# Altium PCB ResearchProject_V3_PCB.PcbDoc (part 1 of 2)
Units mil, origin at the board's own origin, x right, y up, seen from the top; angles counter-clockwise.
Board outline 6000 x 4000 mil, 4 copper layers (Top Layer, GND, 3V3, Bottom Layer), stack 23.756 mil thick; 138 components, 184 nets, 719 pads, 107 vias.
Unrouted connection lines stored in the file: 106.
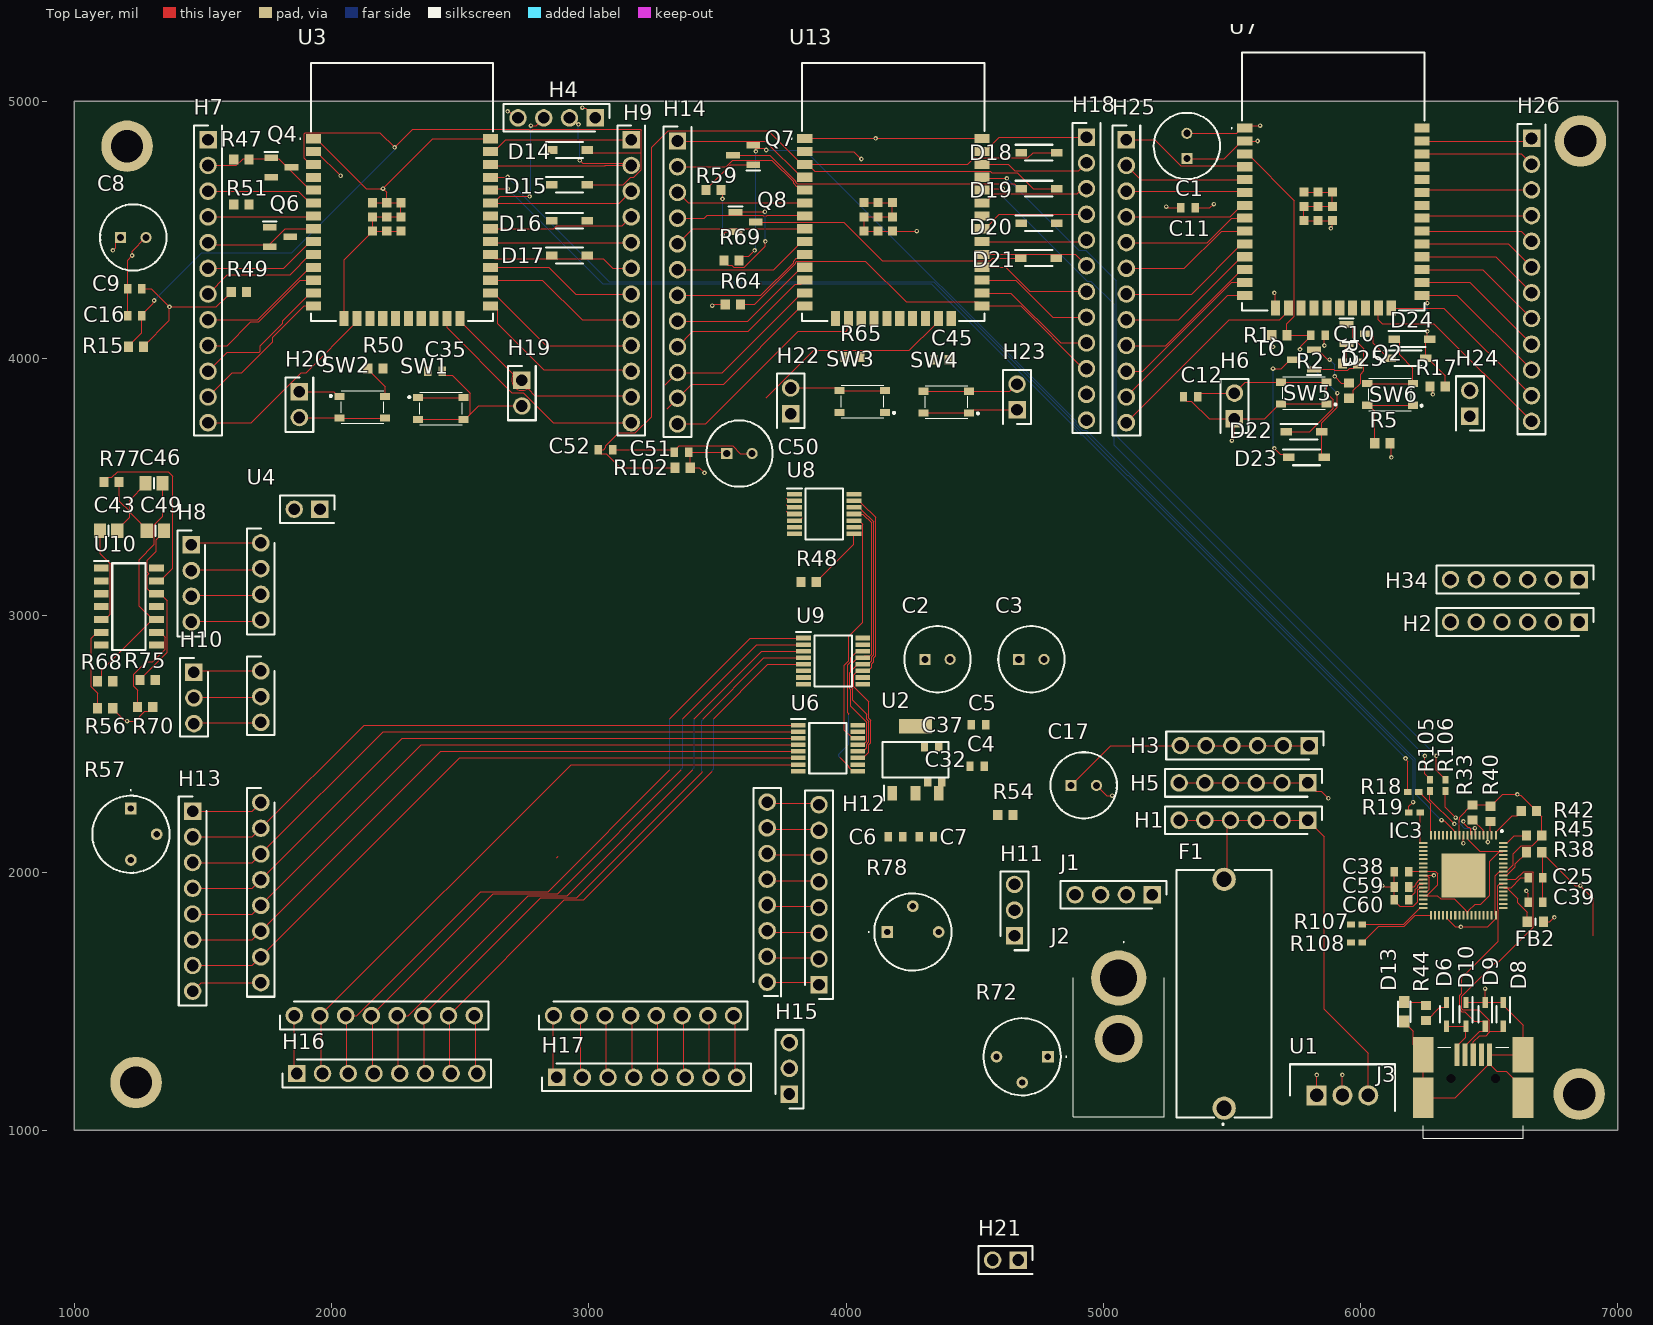
[diagram p0: Top Layer view]
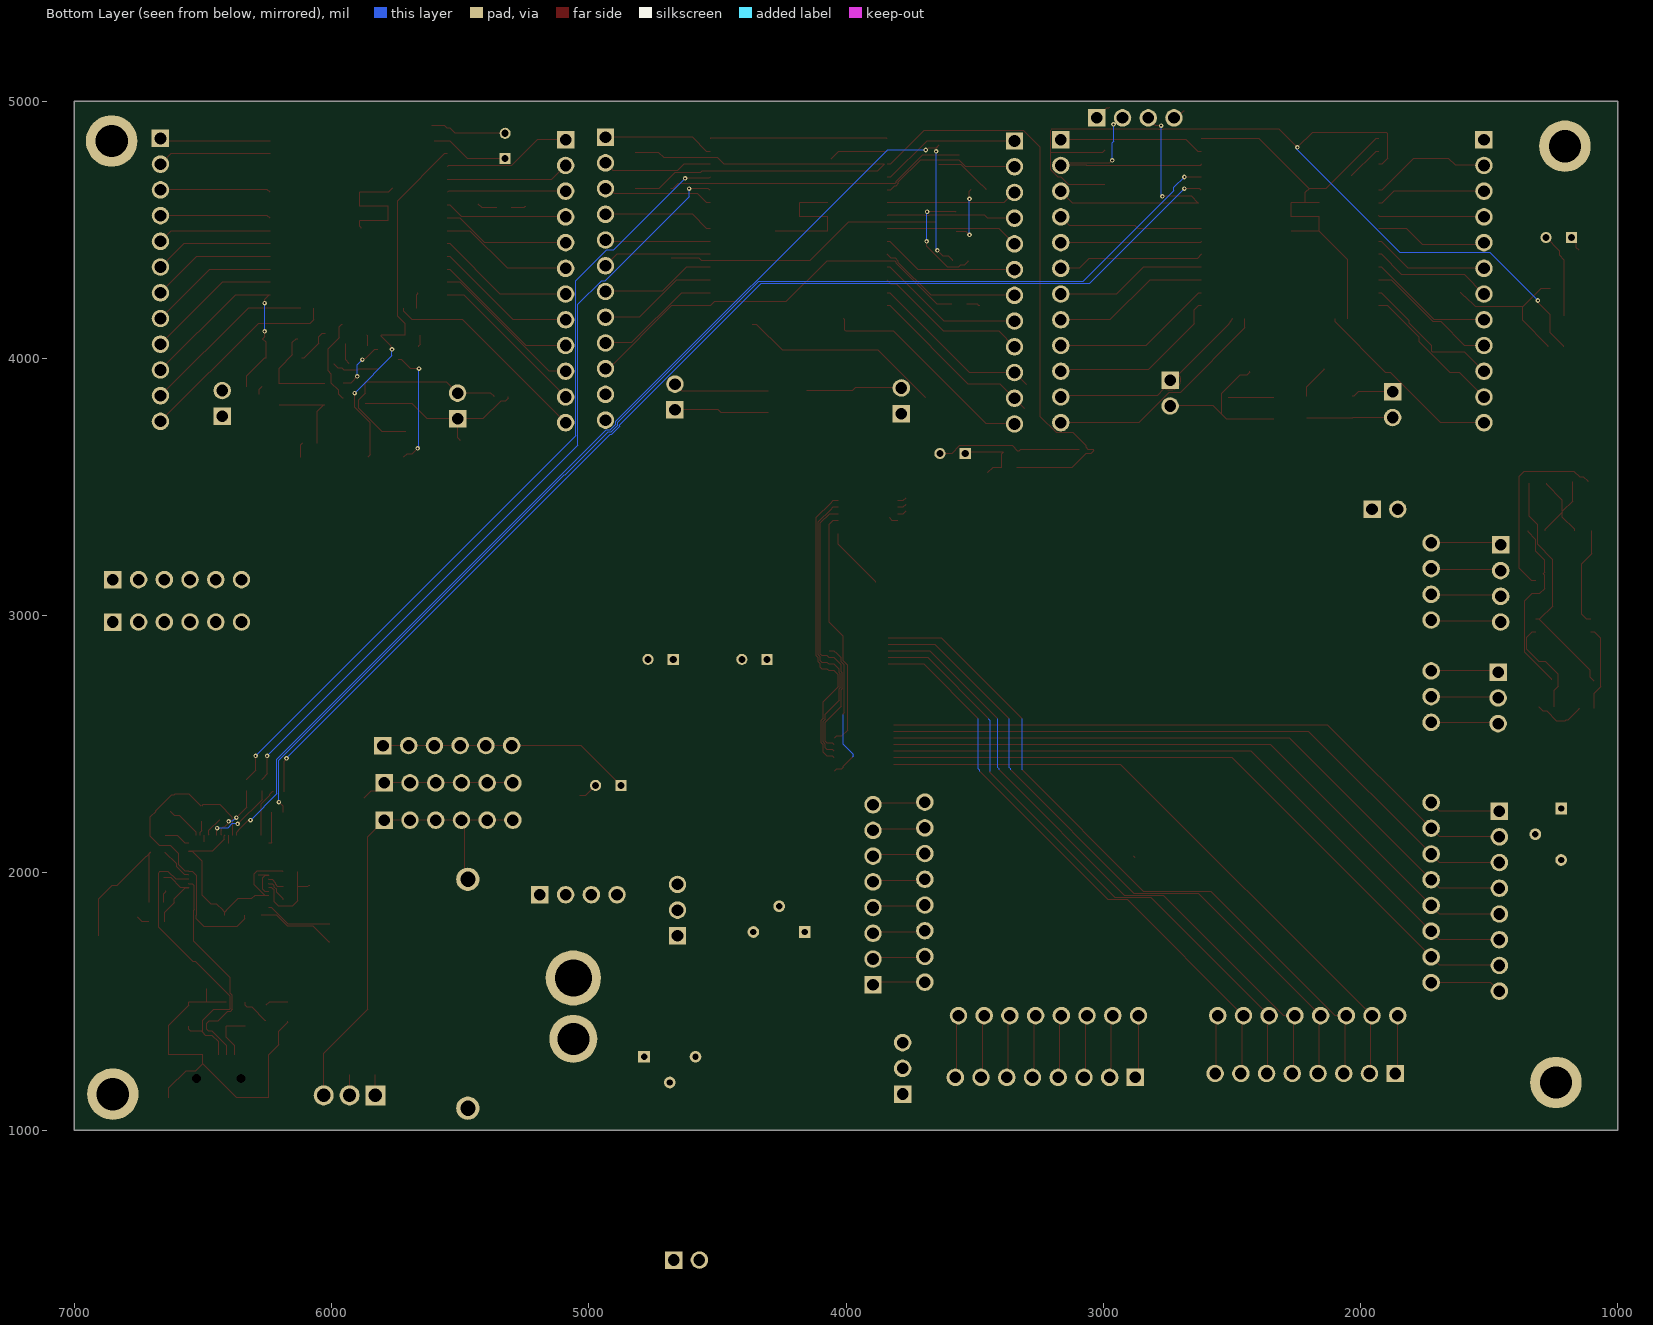
[diagram p1: Bottom Layer view, seen from below]
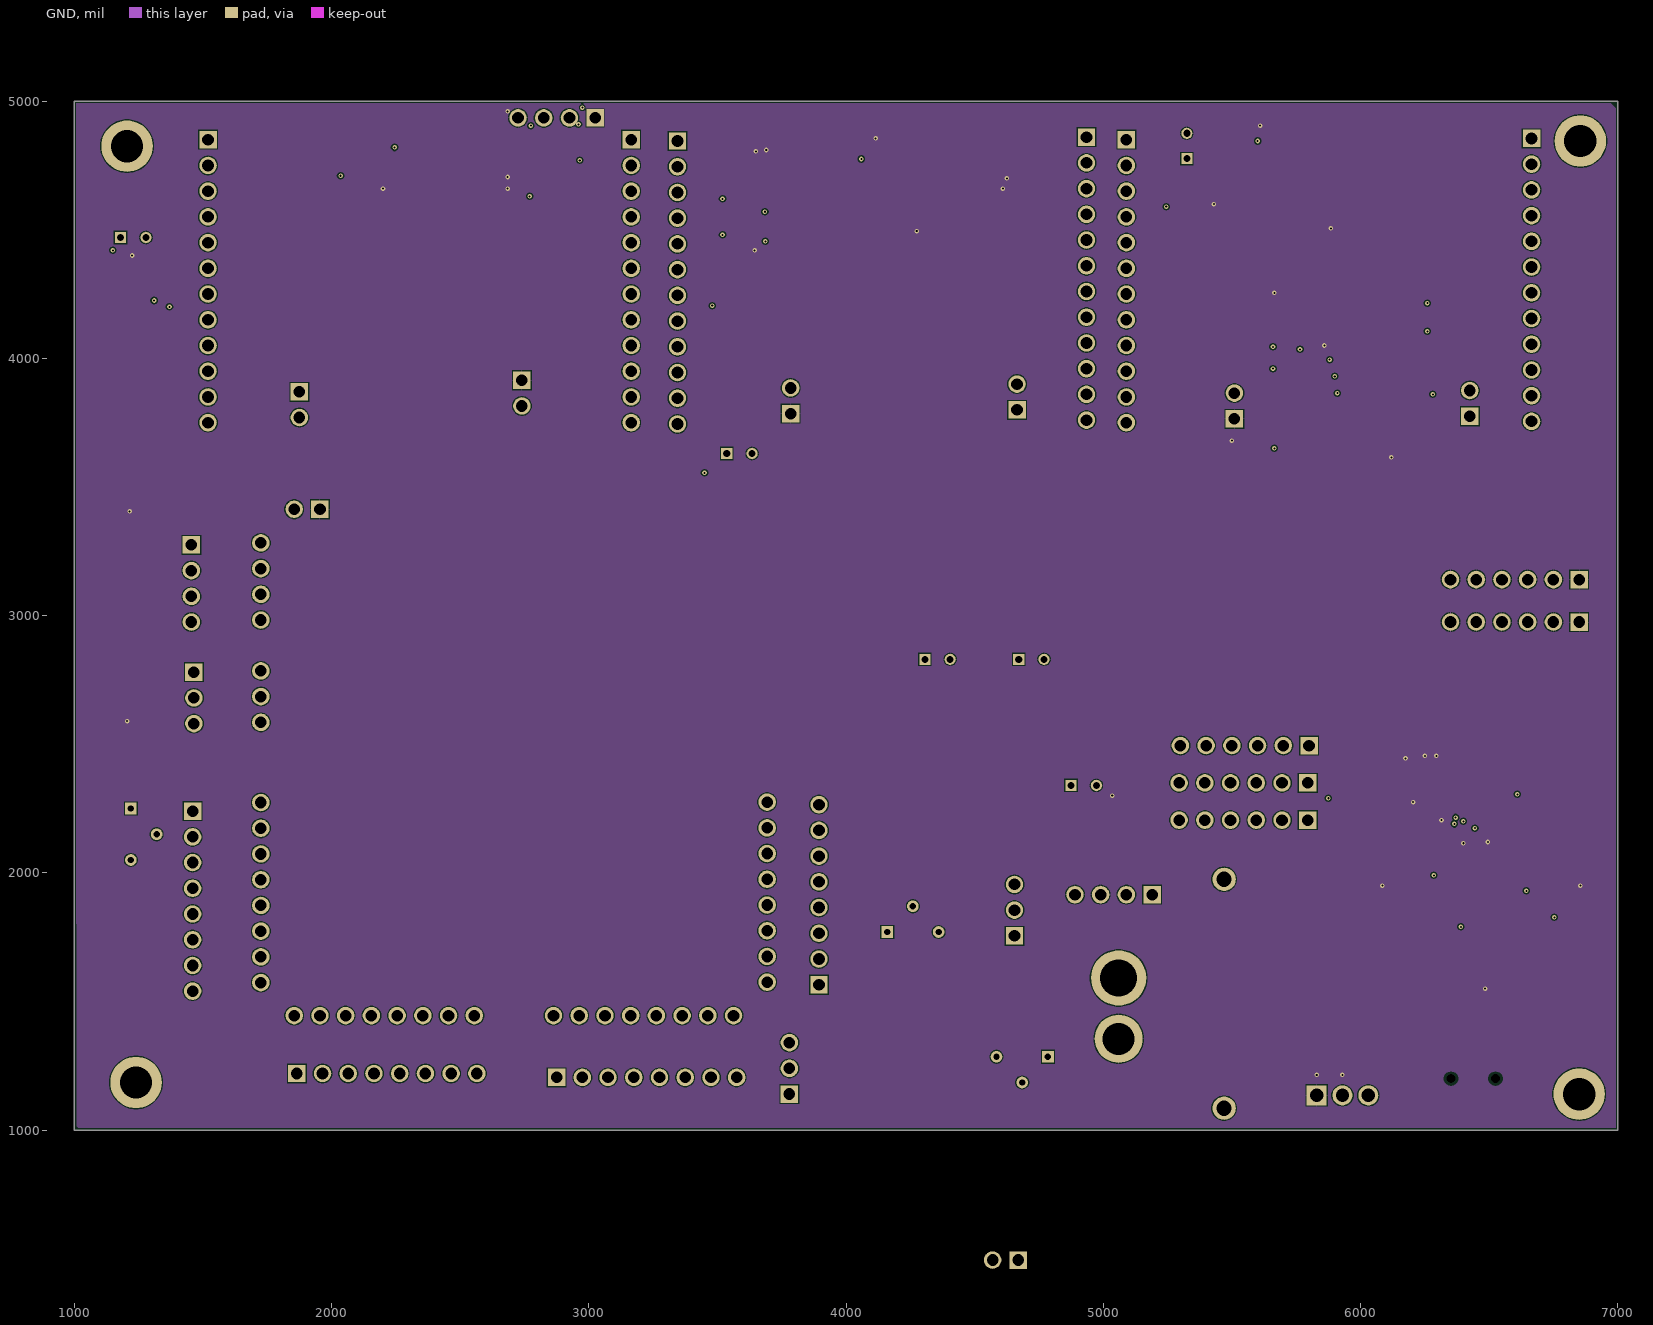
[diagram p2: GND]
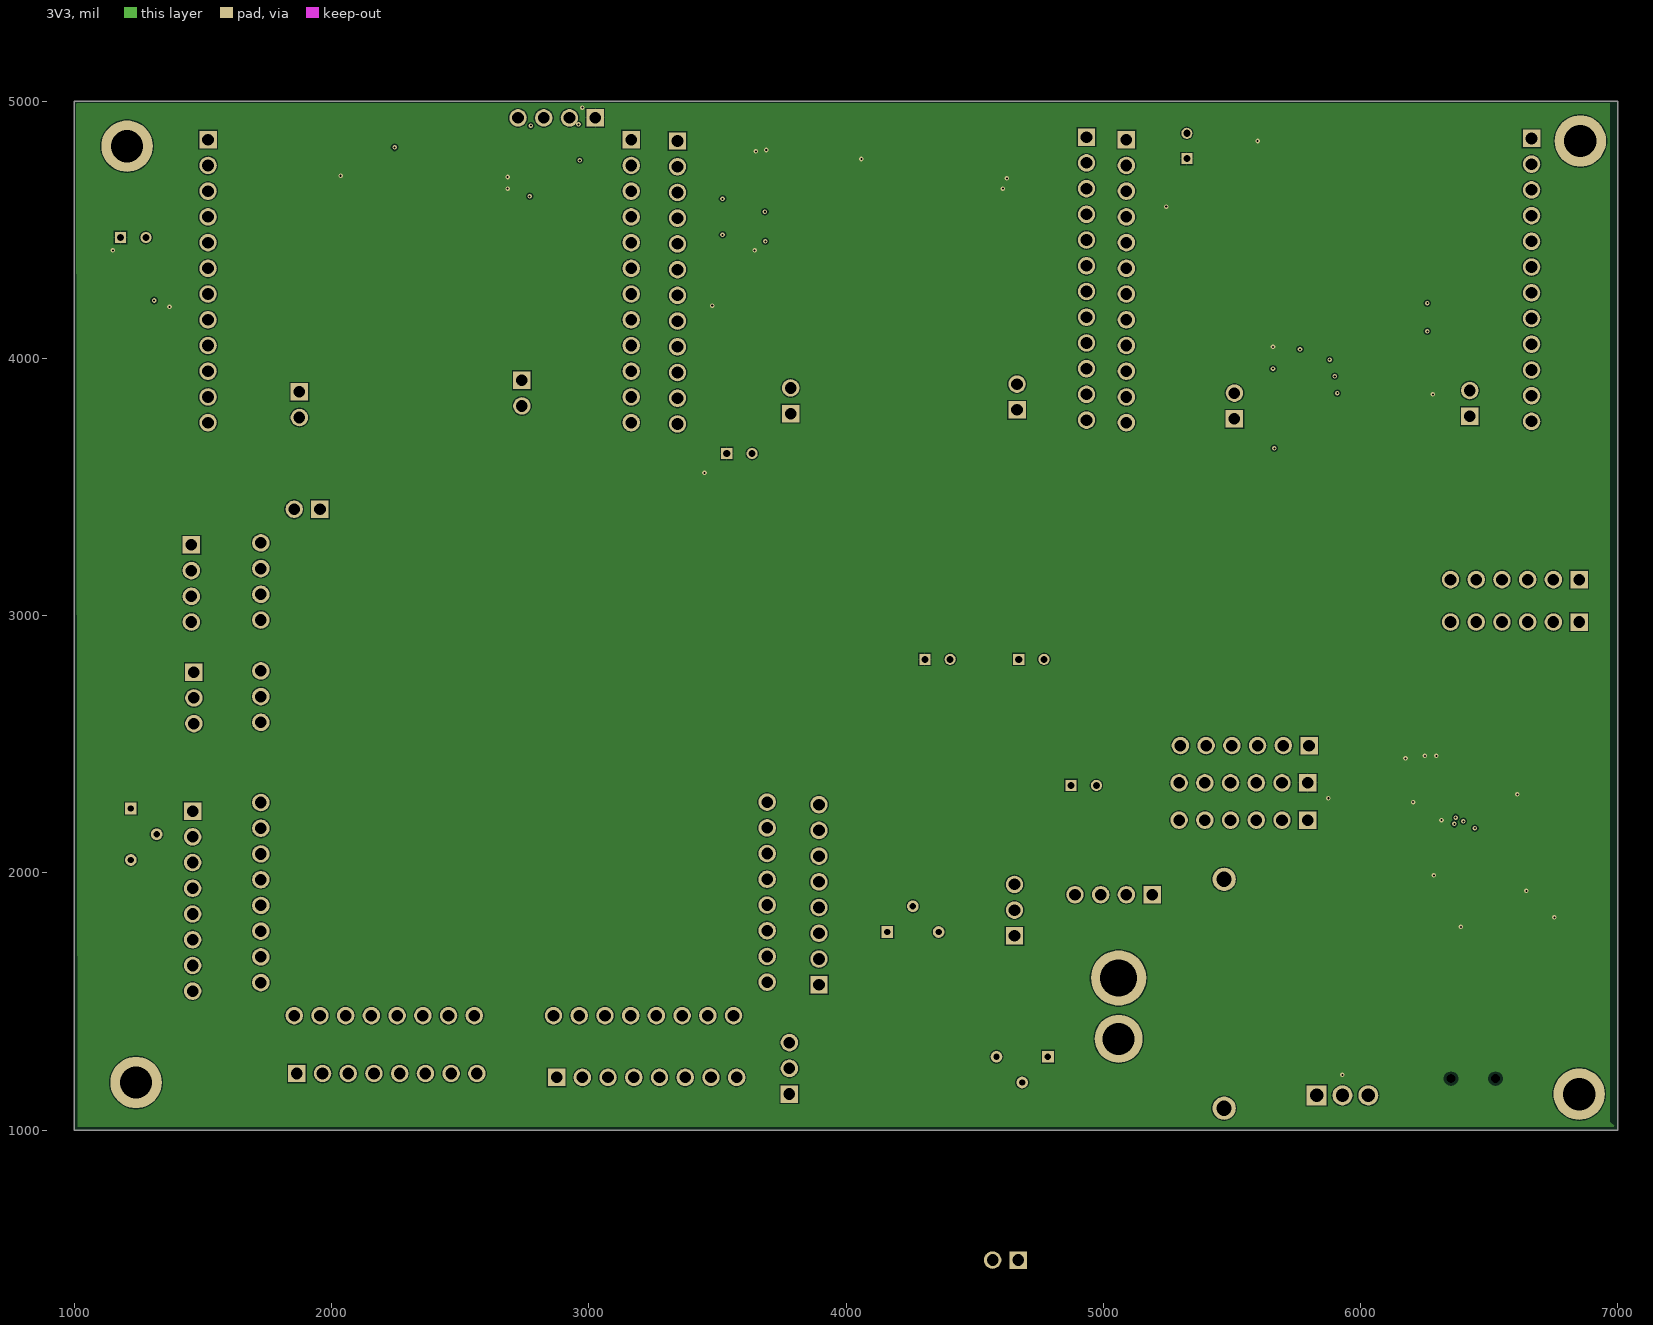
[diagram p3: 3V3]
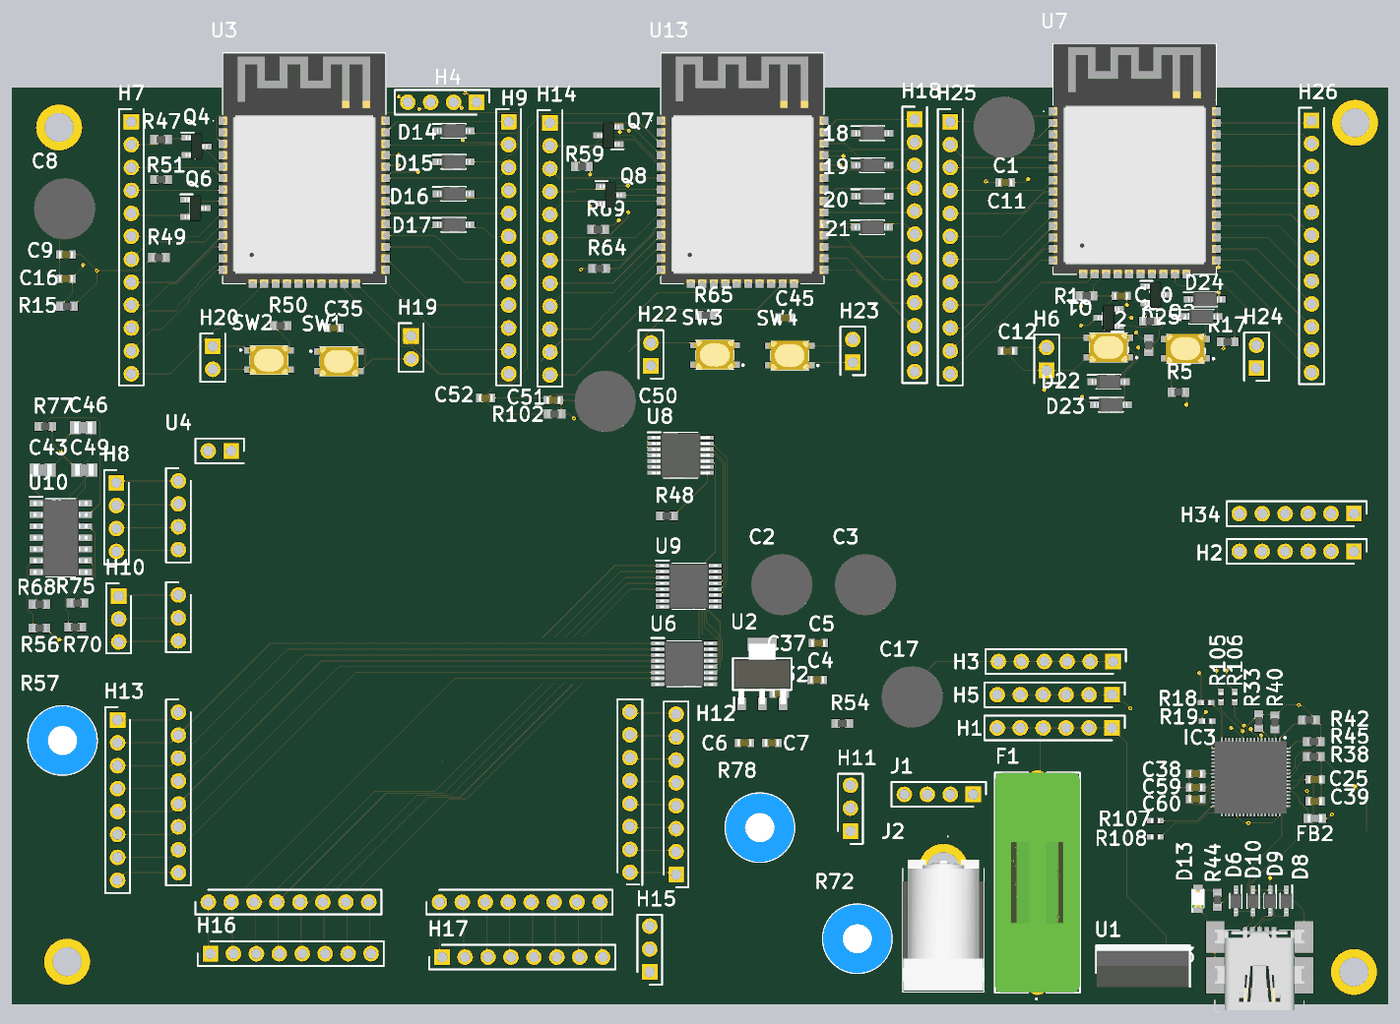
[diagram p5: 3D render of the assembled board from above, using the file's embedded part models]

## Layer stack, top to bottom
Top Solder: solder mask 0.4, Solder Resist, Dk 3.5
Top Layer: signal copper 1.4
Dielectric 2: prepreg 2.8, PP-006, Dk 4.1
GND: signal copper 1.378
Dielectric 1: dielectric 12.6, FR-4, Dk 4.8
3V3: signal copper 1.378
Dielectric 3: prepreg 2.8, PP-006, Dk 4.1
Bottom Layer: signal copper 1.4
Bottom Solder: solder mask 0.4, Solder Resist, Dk 3.5

## Board outline
1000,1000 7000,1000 7000,5000 1000,5000

## Design rules (kind name [scope] priority, off if disabled: settings)
BoardOutlineClearance [All] p1: gap=7.87 ignorepadtopadclearanceinfootprint=FALSE
Clearance [All] p1: gap=4 ignorepadtopadclearanceinfootprint=FALSE except(5: Arc-Via Track-Via SMDPad-Via THPad-Via Via-Via Via-Fill Via-Poly Via-Region Via-Text; 9.84: Arc-Hole Track-Hole SMDPad-Hole THPad-Hole Via-Hole Fill-Hole Poly-Hole Region-Hole Text-Hole)
ComponentClearance [All] p1: gap=4 collisioncheckmode=3 verticalgap=4 showdistances=TRUE
DiffPairsRouting [All] p1: maxlimit=4 minlimit=4 mostfreqgap=4 toplayer_minwidth=4 toplayer_maxwidth=71497.94 toplayer_prefwidth=4 midlayer1_minwidth=4 midlayer1_maxwidth=71497.94 midlayer1_prefwidth=4 midlayer2_minwidth=4 midlayer2_maxwidth=71497.94 midlayer2_prefwidth=4 bottomlayer_minwidth=4 bottomlayer_maxwidth=71497.94 bottomlayer_prefwidth=4 maxuncoupledlength=500
Height [All] p1: minheight=0 maxheight=71497.94 prefheight=500
HoleSize [All] p1: absolutevalues=TRUE maxlimit=248.03 minlimit=7.87 maxpercent=80.000 minpercent=20.000
HoleToHoleClearance [All] p1: gap=9.84 allowstackedmicrovias=FALSE
MinimumAnnularRing [All] p1: minimumring=3
MinimumSolderMaskSliver [All] p1: minsoldermaskwidth=0
PlaneClearance [All] p1: clearance=4
PlaneConnect PlaneConnectPowerPads [InPadClass('PowerPads')] p1: planeconnectstyle=Direct reliefexpansion=20 reliefentries=4 reliefconductorwidth=10 reliefairgap=10
PlaneConnect [All] p2: pad.planeconnectstyle=Relief pad.reliefexpansion=11.81 pad.reliefentries=4 pad.reliefconductorwidth=4 pad.reliefairgap=4 via.planeconnectstyle=Direct via.reliefexpansion=11.81 via.reliefentries=4 via.reliefconductorwidth=5 via.reliefairgap=5
PolygonConnect PolygonConnectPowerPads [All vs (InPadClass('PowerPads'))] p1: connectstyle=Direct reliefconductorwidth=10 reliefentries=4 polygonreliefangle="90 Angle" airgapwidth=10
PolygonConnect [All] p2: thpad.connectstyle=Relief thpad.reliefconductorwidth=4 thpad.reliefentries=4 thpad.polygonreliefangle="90 Angle" thpad.airgapwidth=4 smdpad.connectstyle=Relief smdpad.reliefconductorwidth=4 smdpad.reliefentries=4 smdpad.polygonreliefangle="90 Angle" smdpad.airgapwidth=4 via.connectstyle=Direct via.reliefconductorwidth=5 via.reliefentries=4 via.polygonreliefangle="90 Angle" via.airgapwidth=5
RoutingVias [All] p1: holewidth=7.87 width=17.72 viastyle="Through Hole" minholewidth=7.87 minwidth=17.72 maxholewidth=248.03 maxwidth=257.87
SilkToSilkClearance [All] p1: silktosilkclearance=0
SilkToSolderMaskClearance [IsPad] p1: minsilkscreentomaskgap=4 clearancetoexposedcopper=TRUE
SolderMaskExpansion [All] p1: expansion=2.95 istentingtop=FALSE
SupplyNets "Schematic Supply Nets_4" [InNet('3V3')] p1: voltage=0.000
SupplyNets "Schematic Supply Nets_3" [InNet('+5.0')] p2: voltage=0.000
SupplyNets "Schematic Supply Nets_2" [InNet('USB_VBUS')] p3: voltage=0.000
SupplyNets "Schematic Supply Nets_1" [InNet('+12.0')] p4: voltage=0.000
SupplyNets "Schematic Supply Nets" [InNet('GND')] p5: voltage=0.000
Width [All] p1: maxlimit=71497.94 minlimit=4 preferedwidth=4
20 further rules are at their usual default settings.

## Classes and differential pairs
differential pair USB: +USB_P -USB_N

## Components (designator, comment, footprint, x,y, rotation, side; value= is the part's Value field where it differs from the comment)
C1 "100u" CAPTH6.3x11 5325,4776.57 r90 top
C2 "100u" CAPTH6.3x11 4306.57,2830 r0 top
C3 "100u" CAPTH6.3x11 4671.57,2830 r0 top
C4 "100n" CAP0603 4510,2415 r0 top
C5 "100n" CAP0603 4515,2575 r0 top
C6 "100n" CAP0603 4192.95,2140 r0 top
C7 "100n" CAP0603 4312.05,2140 r180 top
C8 "100u" CAPTH6.3x11 1180,4470 r0 top
C9 "1u" CAP0603 1235,4270 r180 top
C10 "1u" CAP0603 5835,4090 r0 top
C11 "1u" CAP0603 5330,4585 r0 top
C12 "100n" CAP0603 5340,3850 r0 top
C16 "1u" CAP0603 1235,4165 r180 top
C17 "100u" CAPTH6.3x11 4875,2340 r0 top
C25 "100n" CAP0603 6680,1980 r0 top
C32 "100n" CAP0603 4345,2355 r180 top
C35 "100n" CAP0603 2402.05,3950 r0 top
C37 "100n" CAP0603 4332.95,2490 r180 top
C38 "3.3u" CAP0603 6160,2005 r180 top
C39 "1u" CAP0603 6680,1885 r0 top
C43 "10u" CAP0805 1133.46,3330 r0 top
C45 "100n" CAP0603 4370,3995 r180 top
C46 "10u" CAP0805 1310,3515 r180 top
C49 "10u" CAP0805 1315,3330 r180 top
C50 "100u" CAPTH6.3x11 3536.57,3630 r0 top
C51 "1u" CAP0603 3360,3635 r180 top
C52 "1u" CAP0603 3065,3645 r0 top
C59 "18p" CAP0603 6160,1945 r180 top
C60 "18p" CAP0603 6160,1895 r180 top
D6 "BAT60B" SOD323 6335,1450 r270 top
D8 "5V" SOD323 6555,1450 r270 top
D9 "5V" SOD323 6485,1450 r270 top
D10 "5V" SOD323 6410,1450 r270 top
D13 "LED" LEDM2012X80N 6170,1460 r90 top
D14 "1N4148" SOD123 2925,4810 r0 top
D15 "1N4148" SOD123 2925,4675 r0 top
D16 "1N4148" SOD123 2925,4535 r0 top
D17 "1N4148" SOD123 2925,4400 r0 top
D18 "1N4148" SOD123 4750,4800 r0 top
D19 "1N4148" SOD123 4750,4660 r0 top
D20 "1N4148" SOD123 4750,4525 r0 top
D21 "1N4148" SOD123 4748.9,4390 r0 top
D22 "1N4148" SOD123 5780,3715 r0 top
D23 "1N4148" SOD123 5790,3615 r0 top
D24 "1N4148" SOD123 6200,4075 r0 top
D25 "1N4148" SOD123 6185,4000 r0 top
F1 "Fuse" "Fuse Holder 5x20mm" 5470,1530 r90 top
FB2 "1.5k @ 100MHz" BEADC0603 6680,1810 r180 top
H1 "Header" Header_1X6 5795,2204.76 r180 top
H2 "Header" Header_1X6 6850,2975 r180 top
H3 "Header" Header_1X6 5800,2494.76 r180 top
H4 "Header" Header_1X4 3025,4935 r180 top
H5 "Header" Header_1X6 5795,2349.76 r180 top
H6 "Header" Header_1X2 5510,3765 r90 top
H7 "Header" Header_1X12 1520,4850 r270 top
H8 "Header" Header_1X4 1455,3275 r270 top
H9 "Header" Header_1X12 3165,4850 r270 top
H10 "Header" Header_1X3 1465,2780 r270 top
H11 "Header" Header_1X3 4655,1755 r90 top
H12 "Header" Header_1X8 3895,1565 r90 top
H13 "Header" Header_1X8 1460,2240 r270 top
H14 "Header" Header_1X12 3345,4845 r270 top
H15 "Header" Header_1X3 3780,1140 r90 top
H16 "Header" Header_1X8 1865,1220 r0 top
H17 "Header" Header_1X8 2875,1205 r0 top
H18 "Header" Header_1X12 4935,4860 r270 top
H19 "Header" Header_1X2 2740,3915 r270 top
H20 "Header" Header_1X2 1875,3870 r270 top
H21 "Header" Header_1X2 4670,494.76 r180 top
H22 "Header" Header_1X2 3785,3785 r90 top
H23 "Header" Header_1X2 4665,3800 r90 top
H24 "Header" Header_1X2 6425,3775 r90 top
H25 "Header" Header_1X12 5090,4850 r270 top
H26 "Header" Header_1X12 6665,4855 r270 top
H34 "Header" Header_1X6 6850,3140 r180 top
IC3 "FT4232HPQ-TRAY" QFN40P800X800X80-69N-D 6400,1990 r270 top
J1 "Header" Header_1X4 5190,1915 r180 top
J2 "PJ-037AH" PJ037AH 5060,1591.22 r90 top
J3 "USB Mini B Connector" "USB Mini-B" 6438.39,1292.52 r90 top
Q1 "BC817-40" SOT23 5780,3995 r90 top
Q2 "BC817-40" SOT23 5985,4095 r270 top
Q4 "BC817-40" SOT23 1804.74,4742.51 r270 top
Q6 "BC817-40" SOT23 1799.74,4472.51 r270 top
Q7 "BC817-40" SOT23 3600,4790 r90 top
Q8 "BC817-40" SOT23 3610,4530 r270 top
R1 "10k" RESC0603 5684.53,4090 r0 top
R2 "100k" RESC0603 5960,3980 r0 top
R3 "100k" RESC0603 5955,3874.53 r270 top
R5 "1k" RESC0603 6085,3670 r0 top
R15 "10k" RESC0603 1240,4045 r180 top
R17 "20k" RESC0603 6300,3890 r180 top
R18 "0" RESC0402 6205,2315 r180 top
R19 "0" RESC0402 6210,2235 r180 top
R33 "1k" RESC0603 6435,2234.53 r90 top
R38 "12k" RESC0603 6675,2080 r0 top
R40 "10k" RESC0603 6505,2229.53 r270 top
R42 "10k" RESC0603 6654.53,2240 r180 top
R44 "2.2k" RESC0603 6255,1455 r270 top
R45 "10k" RESC0603 6675,2145 r0 top
R47 "100k" RESC0603 1649.26,4772.51 r180 top
R48 "10k" RESC0603 3855,3130 r180 top
R49 "20k" RESC0603 1639.74,4257.51 r180 top
R50 "1k" RESC0603 2170.47,3960 r0 top
R51 "100k" RESC0603 1649.26,4597.51 r0 top
R54 "10k" RESC0603 4619.53,2225 r180 top
R56 "12k" RESC0603 1120,2640 r180 top
R57 "10k" 3339P1103LF 1220,2250 r270 top
R59 "100k" RESC0603 3485,4655 r180 top
R64 "20k" RESC0603 3560,4210 r180 top
R65 "1k" RESC0603 4025,4005 r180 top
R68 "10k" RESC0603 1120,2745 r180 top
R69 "100k" RESC0603 3555,4380 r180 top
R70 "12k" RESC0603 1275.47,2645 r180 top
R72 "10k" 3339P1103LF 4785,1285 r180 top
R75 "10k" RESC0603 1285,2750 r180 top
R77 "12k" RESC0603 1145,3520 r180 top
R78 "10k" 3339P1103LF 4160,1770 r0 top
R102 "10k" RESC0603 3365,3575 r180 top
R105 "0" RESC0402 6270,2340 r90 top
R106 "0" RESC0402 6330,2340 r90 top
R107 "0" RESC0402 5984.69,1800 r180 top
R108 "0" RESC0402 5985,1730 r180 top
SW1 "Tactile Switch - 1" "Tactile Button 4.2mm x 3.2mm" 2425,3805 r0 top
SW2 "Tactile Switch - 1" "Tactile Button 4.2mm x 3.2mm" 2120,3810 r0 top
SW3 "Tactile Switch - 1" "Tactile Button 4.2mm x 3.2mm" 4063.58,3832.32 r180 top
SW4 "Tactile Switch - 1" "Tactile Button 4.2mm x 3.2mm" 4390,3830 r180 top
SW5 "Tactile Switch - 1" "Tactile Button 4.2mm x 3.2mm" 5780,3865 r180 top
SW6 "Tactile Switch - 1" "Tactile Button 4.2mm x 3.2mm" 6115,3860 r180 top
U1 "LD1086V33-DG" TO-220-3 5829.61,1135 r0 top
U2 "AZ1117CH2-5.0TRG1" SOT223 4270.16,2439.92 r90 top
U3 "ESP32-WROOM-32E-N8" ESP32WROOM32EN8 2273.94,4646.73 r0 top
U4 "eACE 5150v5" eACEv5150 1736.89,3401.69 r0 top
U6 "74HC595" TSSOP16 3930,2485 r0 top
U7 "ESP32-WROOM-32E-N8" ESP32WROOM32EN8 5894.49,4687.91 r0 top
U8 "LSF0204DPWR" TSSOP14 3915,3395 r0 top
U9 "74HC595" TSSOP16 3950.16,2823.39 r0 top
U10 "LM324" SOIC14 1212.05,3035 r0 top
U13 "ESP32-WROOM-32E-N8" ESP32WROOM32EN8 4184.17,4646.97 r0 top

## Footprints (in the part's own frame and the unit in brackets; to place one, negate y for a bottom-side part, rotate by r counter-clockwise, add the part's x,y. Pads: shape width x height; smd on the part's side, far side on the other; paste and mask are expansions set on the pad)
3339P1103LF [mm]
  rect 1.155x1.155 hole 0.63: 1(0,0)
  round 1.155 hole 0.63: 2(2.54,2.54) 3(5.08,0)
  silkscreen extent -1.86,-3.81 6.35,3.81, body extent -1.27,-3.81 6.35,3.81, height 6.42
BEADC0603 [mm]
  rect 0.9x1 smd: 1(-0.8,0) 2(0.8,0)
  silkscreen extent 0,-0.3 0,0.3, body extent -0.8,-0.4 0.8,0.4, height 0.95
CAP0603 [mm]
  rect 0.73x0.94 smd: 1(-0.71,0) 2(0.71,0)
  body extent -0.8,-0.4 0.8,0.4, height 0.9
CAP0805 [mm]
  rect 1.2x1.45 smd: 1(-0.85,0) 2(0.85,0)
  silkscreen extent 0,-0.53 0,0.53, body extent -1,-0.63 1,0.63, height 1.1
CAPTH6.3x11 [mm]
  rect 1.1x1.1 hole 0.7: 1(0,0)
  round 1.1 hole 0.7: 2(2.5,0)
  silkscreen extent -2.02,-3.27 4.52,3.27, body extent -2.14,-3.4 4.65,3.4, height 13
eACEv5150 [mm]
  rect 1.725x1.725 hole 1.15: 1(5.54,0.3)
  round 1.725 hole 1.15: 2(3,0.3) 3(-0.3,-3.02) 4(-0.3,-5.56) 5(-0.3,-8.1) 6(-0.3,-10.64) 7(-0.3,-15.66) 8(-0.3,-18.2) 9(-0.3,-20.74) 10(-0.3,-28.66) 11(-0.3,-31.2) 12(-0.3,-33.74) 13(-0.3,-36.28) 14(-0.3,-38.82) 15(-0.3,-41.36) 16(-0.3,-43.9) 17(-0.3,-46.44) 18(3,-49.7) 19(5.54,-49.7) 20(8.08,-49.7) 21(10.62,-49.7) 22(13.16,-49.7) 23(15.7,-49.7) 24(18.24,-49.7) 25(20.78,-49.7) 26(28.6,-49.7) 27(31.14,-49.7) 28(33.68,-49.7) 29(36.22,-49.7) 30(38.76,-49.7) 31(41.3,-49.7) 32(43.84,-49.7) 33(46.38,-49.7) 34(49.7,-46.4) 35(49.7,-43.86) 36(49.7,-41.32) 37(49.7,-38.78) 38(49.7,-36.24) 39(49.7,-33.7) 40(49.7,-31.16) 41(49.7,-28.62)
  silkscreen extent -1.67,-51.07 51.07,1.68, body extent 0,-49.34 49.38,0.04, height 8.89
ESP32WROOM32EN8 [mm]
  rect 1.5x0.9 smd: 1(-8.75,5.26) 2(-8.75,3.99) 3(-8.75,2.72) 4(-8.75,1.45) 5(-8.75,0.18) 6(-8.75,-1.09) 7(-8.75,-2.36) 8(-8.75,-3.63) 9(-8.75,-4.9) 10(-8.75,-6.17) 11(-8.75,-7.44) 12(-8.75,-8.71) 13(-8.75,-9.98) 14(-8.75,-11.25) 25(8.75,-11.25) 26(8.75,-9.98) 27(8.75,-8.71) 28(8.75,-7.44) 29(8.75,-6.17) 30(8.75,-4.9) 31(8.75,-3.63) 32(8.75,-2.36) 33(8.75,-1.09) 34(8.75,0.18) 35(8.75,1.45) 36(8.75,2.72) 37(8.75,3.99) 38(8.75,5.26)
  rect 0.9x1.5 smd: 15(-5.715,-12.5) 16(-4.445,-12.5) 17(-3.175,-12.5) 18(-1.905,-12.5) 19(-0.635,-12.5) 20(0.635,-12.5) 21(1.905,-12.5) 22(3.175,-12.5) 23(4.445,-12.5) 24(5.715,-12.5)
  rect 0.9x0.9 smd: 39(-2.9,-1.06) 40(-2.9,-2.46) 41(-2.9,-3.86) 42(-1.5,-3.86) 43(-0.1,-3.86) 44(-0.1,-2.46) 45(-0.1,-1.06) 46(-1.5,-1.06) 47(-1.5,-2.46)
  silkscreen extent -10.1,-12.75 9,12.75, body extent -9,-12.75 9,12.75, height 3.13
"Fuse Holder 5x20mm" [mm]
  round 2.3 hole 1.5: 1(-11.3,0) 2(11.3,0)
  silkscreen extent -12.95,-4.7 12.2,4.7, body extent -12.2,-4.7 12.2,4.7, height 13.36
Header_1X2 [mm]
  rect 1.725x1.725 hole 1.15: 1(0,0)
  round 1.725 hole 1.15: 2(2.54,0)
  silkscreen extent -1.42,-1.38 3.95,1.37
Header_1X3 [mm]
  rect 1.725x1.725 hole 1.15: 1(0,0)
  round 1.725 hole 1.15: 2(2.54,0) 3(5.08,0)
  silkscreen extent -1.42,-1.37 6.35,1.37
Header_1X4 [mm]
  rect 1.725x1.725 hole 1.15: 1(0,0)
  round 1.725 hole 1.15: 2(2.54,0) 3(5.08,0) 4(7.62,0)
  silkscreen extent -1.42,-1.37 9.04,1.37
Header_1X6 [mm]
  rect 1.725x1.725 hole 1.15: 1(0,0)
  round 1.725 hole 1.15: 2(2.54,0) 3(5.08,0) 4(7.62,0) 5(10.16,0) 6(12.7,0)
  silkscreen extent -1.42,-1.37 14.1,1.37
Header_1X8 [mm]
  rect 1.725x1.725 hole 1.15: 1(0,0)
  round 1.725 hole 1.15: 2(2.54,0) 3(5.08,0) 4(7.62,0) 5(10.16,0) 6(12.7,0) 7(15.24,0) 8(17.78,0)
  silkscreen extent -1.42,-1.37 19.18,1.37
Header_1X12 [mm]
  rect 1.725x1.725 hole 1.15: 1(0,0)
  round 1.725 hole 1.15: 2(2.54,0) 3(5.08,0) 4(7.62,0) 5(10.16,0) 6(12.7,0) 7(15.24,0) 8(17.78,0) 9(20.32,0) 10(22.86,0) 11(25.4,0) 12(27.94,0)
  silkscreen extent -1.42,-1.37 29.21,1.37
LEDM2012X80N [mm]
  rect 1.2x1.05 smd: 1(-0.95,0) 2(0.95,0)
  silkscreen extent -1.48,-0.63 1,0.63, body extent -1,-0.63 1,0.63, height 0.7
PJ037AH [mm]
  round 5.46 hole 3.64: 1(0,0)
  round 4.74 hole 3.16: 2(-6,0)
  silkscreen extent -13.7,-4.5 3.6,4.5, body extent -13.5,-4.5 1,4.5, height 11
QFN40P800X800X80-69N-D [mm]
  rect 0.85x0.2 smd: 1(-3.95,3.2) 2(-3.95,2.8) 3(-3.95,2.4) 4(-3.95,2) 5(-3.95,1.6) 6(-3.95,1.2) 7(-3.95,0.8) 8(-3.95,0.4) 9(-3.95,0) 10(-3.95,-0.4) 11(-3.95,-0.8) 12(-3.95,-1.2) 13(-3.95,-1.6) 14(-3.95,-2) 15(-3.95,-2.4) 16(-3.95,-2.8) 17(-3.95,-3.2) 35(3.95,-3.2) 36(3.95,-2.8) 37(3.95,-2.4) 38(3.95,-2) 39(3.95,-1.6) 40(3.95,-1.2) 41(3.95,-0.8) 42(3.95,-0.4) 43(3.95,0) 44(3.95,0.4) 45(3.95,0.8) 46(3.95,1.2) 47(3.95,1.6) 48(3.95,2) 49(3.95,2.4) 50(3.95,2.8) 51(3.95,3.2)
  rect 0.2x0.85 smd: 18(-3.2,-3.95) 19(-2.8,-3.95) 20(-2.4,-3.95) 21(-2,-3.95) 22(-1.6,-3.95) 23(-1.2,-3.95) 24(-0.8,-3.95) 25(-0.4,-3.95) 26(0,-3.95) 27(0.4,-3.95) 28(0.8,-3.95) 29(1.2,-3.95) 30(1.6,-3.95) 31(2,-3.95) 32(2.4,-3.95) 33(2.8,-3.95) 34(3.2,-3.95) 52(3.2,3.95) 53(2.8,3.95) 54(2.4,3.95) 55(2,3.95) 56(1.6,3.95) 57(1.2,3.95) 58(0.8,3.95) 59(0.4,3.95) 60(0,3.95) 61(-0.4,3.95) 62(-0.8,3.95) 63(-1.2,3.95) 64(-1.6,3.95) 65(-2,3.95) 66(-2.4,3.95) 67(-2.8,3.95) 68(-3.2,3.95)
  rect 4.35x4.35 smd: 69(0,0)
  silkscreen extent -4.47,3.7 -4.28,3.9, body extent -4.05,-4.05 4.05,4.05, height 0.8
RESC0402 [mm]
  rect 0.75x0.6 smd: 1(-0.55,0) 2(0.55,0)
  body extent -0.5,-0.25 0.5,0.25, height 0.4
RESC0603 [mm]
  rect 0.9x1 smd: 1(-0.75,0) 2(0.75,0)
  body extent -0.77,-0.4 0.78,0.4, height 0.45
SOD123 [mm]
  rect 1.15x0.75 smd: 1(-1.75,0) 2(1.75,0)
  silkscreen extent -2.32,-0.77 1.35,0.77, body extent -1.85,-0.77 1.85,0.77, height 1.35
SOD323 [mm]
  rect 1.1x0.5 smd: 1(-1.175,0) 2(1.175,0)
  silkscreen extent -1.73,-0.65 0.8,0.65, body extent -1.33,-0.65 1.33,0.65, height 1.1
SOIC14 [mm]
  rect 1.462x0.7 smd: 1(-2.719,3.81) 2(-2.719,2.54) 3(-2.719,1.27) 4(-2.719,0) 5(-2.719,-1.27) 6(-2.719,-2.54) 7(-2.719,-3.81) 8(2.719,-3.81) 9(2.719,-2.54) 10(2.719,-1.27) 11(2.719,0) 12(2.719,1.27) 13(2.719,2.54) 14(2.719,3.81)
  silkscreen extent -3.45,-4.28 1.64,4.51, body extent -3,-4.28 3,4.28, height 1.8
SOT23 [mm]
  rect 0.65x1.35 smd: 1(-0.96,-1) 2(0.96,-1) 3(0,1)
  silkscreen extent -1.54,-1.68 -1.54,-0.33, body extent -1.45,-1.2 1.45,1.2, height 0.95
SOT223 [mm]
  rect 1.45x0.95 smd: 1(-3.3,2.29) 2(-3.3,0) 3(-3.3,-2.29)
  rect 1.45x3.25 smd: 4(3.3,0)
  silkscreen extent -4.03,-3.25 1.75,3.25, body extent -3.35,-3.15 3.35,3.15, height 1.8
"Tactile Button 4.2mm x 3.2mm" [mm]
  rect 1x0.7 smd: 1(-2.25,1.075) 2(2.25,1.075) 3(-2.25,-1.075) 4(2.25,-1.075)
  silkscreen extent -3.22,-1.6 2.1,1.61, body extent -2.3,-1.6 2.3,1.6, height 2.6
TO-220-3 [mm]
  rect 1.98x1.98 hole 1.32: 1(0,0)
  round 1.98 hole 1.32: 2(2.55,0) 3(5.1,0)
  silkscreen extent -2.65,-1.53 7.75,3.07, body extent -2.55,-1.53 7.65,3.07, height 19.22
TSSOP14 [mm]
  rect 1.475x0.45 smd: 1(-2.938,1.95) 2(-2.938,1.3) 3(-2.938,0.65) 4(-2.938,0) 5(-2.938,-0.65) 6(-2.938,-1.3) 7(-2.938,-1.95) 8(2.938,-1.95) 9(2.938,-1.3) 10(2.938,-0.65) 11(2.938,0) 12(2.938,0.65) 13(2.938,1.3) 14(2.938,1.95)
  silkscreen extent -3.67,-2.5 1.85,2.52, body extent -3.2,-2.5 3.2,2.5, height 1.13
TSSOP16 [mm]
  rect 1.45x0.45 smd: 1(-2.925,2.275) 2(-2.925,1.625) 3(-2.925,0.975) 4(-2.925,0.325) 5(-2.925,-0.325) 6(-2.925,-0.975) 7(-2.925,-1.625) 8(-2.925,-2.275) 9(2.925,-2.275) 10(2.925,-1.625) 11(2.925,-0.975) 12(2.925,-0.325) 13(2.925,0.325) 14(2.925,0.975) 15(2.925,1.625) 16(2.925,2.275)
  silkscreen extent -3.65,-2.5 1.85,2.85, body extent -3.2,-2.5 3.2,2.5, height 1.2
"USB Mini-B" [mm]
  rect 2.25x0.5 smd: 1(0,1.6) 2(0,0.8) 3(0,0) 4(0,-0.8) 5(0,-1.6)
  rect 3.5x2.05 smd: 6(0,4.925) 8(0,-4.925)
  rect 4x2.05 smd: 7(-4.25,4.925) 9(-4.25,-4.925)
  round 0 hole 0.9 unplated: 10(-2.35,2.2) 11(-2.35,-2.2)
  silkscreen extent -8.25,-4.95 0.75,4.95, body extent -8.19,-4.95 0.81,4.95, height 3.95

## Part data
C1 C4 C5 C6 C7 C8 C9 C10 C11 C12 C16 C25 C32 C35 C37 C38 C39 C43 C45 C46 C49 C50 C51 C52 C59 C60: library part "Capacitor - Non Polarized", "Non Polarized Capacitor"
C2 C3 C17: library part "Capacitor - Polarized", "Polarized Capacitor"
D6: "Schottky Diodes & Rectifiers 10 V 3000 mA", ComponentLink1Description=Datasheet, ComponentLink1URL=https://www.smc-diodes.com/propdf/1N4148W%20N0571%20REV.E.pdf
D8 D9 D10: library part "TVS Diode", "TVS Diode"
D13: "General Purpose LED", ComponentLink1Description=Datasheet, ComponentLink1URL=https://www.smc-diodes.com/propdf/1N4148W%20N0571%20REV.E.pdf
D14 D15 D16 D17 D18 D19 D20 D21 D22 D23 D24 D25: "1N4148 General Purpose Switching Diode", ComponentLink1Description=Datasheet, ComponentLink1URL=https://www.smc-diodes.com/propdf/1N4148W%20N0571%20REV.E.pdf
FB2: library part "Ferrite Bead", "Ferrite Bead"
H1 H2 H3 H5 H34: library part "6-Pin Header", "6-Pin Header"
H4 H8 J1: library part "4-Pin Header", "4-Pin Header"
H6 H19 H20 H21 H22 H23 H24: library part "2-Pin Header", "2-Pin Header"
H7 H9 H14 H18 H25 H26: library part "12-Pin Header", "12-Pin Header"
H10 H11 H15: library part "3-Pin Header", "3-Pin Header"
H12 H13 H16 H17: library part "8-Pin Header", "8-Pin Header"
IC3: "Integrated Circuit", Manufacturer_Name="FTDI Chip", Mouser Part Number=895-FT4232HPQ-TRAY, Datasheet Link=https://www.ftdichip.com/Support/Documents/DataSheets/ICs/DS_FT4233HP.pdf, Height=0.8mm, Manufacturer_Part_Number=FT4232HPQ-TRAY, Mouser Price/Stock=https://www.mouser.co.uk/ProductDetail/FTDI/FT4232HPQ-TRAY?qs=DRkmTr78QATL4FSPfVZC7Q%3D%3D
J2: "Connector", Manufacturer_Name="Same Sky", Mouser Part Number=490-PJ-037AH, Arrow Part Number=PJ-037AH, Arrow Price/Stock=https://www.arrow.com/en/products/pj-037ah/cui-devices?region=nac, Datasheet Link=https://www.arrow.com/en/products/pj-037ah/cui-devices, Height=11.2mm, Manufacturer_Part_Number=PJ-037AH, Mouser Price/Stock=https://www.mouser.co.uk/ProductDetail/CUI-Devices/PJ-037AH?qs=WyjlAZoYn50M7m1AkzfPaQ%3D%3D
Q1 Q2 Q4 Q6 Q7 Q8: "Transistor BJT NPN", Arrow Part Number=BC817-40,215, Manufacturer_Name=Nexperia, Mouser Part Number=771-BC817-40-T/R, Arrow Price/Stock=https://www.arrow.com/en/products/bc817-40215/nexperia?region=europe, Datasheet Link=https://assets.nexperia.com/documents/data-sheet/BC817_SER.pdf, Height=1.1mm, Manufacturer_Part_Number=BC817-40,215, Mouser Price/Stock=https://www.mouser.co.uk/ProductDetail/Nexperia/BC817-40215?qs=me8TqzrmIYU%252B245p8hOLaQ%3D%3D
R1 R2 R3 R5 R15 R17 R18 R19 R33 R38 R40 R42 R44 R45 R47 R48 R49 R50 R51 R54 R56 R59 R64 R65 R68 R69 R70 R75 R77 R102 R105 R106 R107 R108: library part Resistor, "Resistor"
R57 R72 R78: library part Potentiometer, "Potentionmeter"
SW1 SW2 SW3 SW4 SW5 SW6: "Tactile Pushbutton - Contact Pad"
U1: "Power Supply", Manufacturer_Name=STMicroelectronics, Mouser Part Number=511-LD1086V33-DG, Arrow Part Number=LD1086V33-DG, Arrow Price/Stock=https://www.arrow.com/en/products/ld1086v33-dg/stmicroelectronics?region=europe, Datasheet Link=https://componentsearchengine.com/Datasheets/1/LD1086V33-DG.pdf, Height=4.6mm, Manufacturer_Part_Number=LD1086V33-DG, Mouser Price/Stock=https://www.mouser.co.uk/ProductDetail/STMicroelectronics/LD1086V33-DG?qs=kWQV1gtkNncEt67PbJzViw%3D%3D
U2: "5.0V Linear Voltage Regulator"
U3 U7 U13: "Integrated Circuit", Manufacturer_Name="Espressif Systems", Mouser Part Number=356-ESP32WRM32E164PH, Datasheet Link=https://www.google.com/url?sa=t&rct=j&q=&esrc=s&source=web&cd=&ved=2ahUKEwjLw4ysybv2AhXFzIUKHZUbB64QFnoECCwQAQ&url=https%3A%2F%2Fwww.espressif.com%2Fsites%2Fdefault%2Ffiles%2Fdocumentation%2Fesp32-wroom-32e_esp32-wroom-32ue_datasheet_en.pdf&usg=AOvVaw1xSL, Height=3.25mm, Manufacturer_Part_Number=ESP32-WROOM-32E-N8, Mouser Price/Stock=https://www.mouser.co.uk/ProductDetail/Espressif-Systems/ESP32-WROOM-32E-N8?qs=Li%252BoUPsLEnsLnZW%252BGLgUhw%3D%3D
U6 U9: "Shift Register"
U8: "Integrated Circuit", Manufacturer_Name="Texas Instruments", Mouser Part Number=595-LSF0204DPWR, Arrow Part Number=LSF0204DPWR, Arrow Price/Stock=https://www.arrow.com/en/products/lsf0204dpwr/texas-instruments?region=nac, Datasheet Link=http://www.ti.com/lit/gpn/lsf0204d, Height=1.2mm, Manufacturer_Part_Number=LSF0204DPWR, Mouser Price/Stock=https://www.mouser.co.uk/ProductDetail/Texas-Instruments/LSF0204DPWR?qs=ADSrZYdIRCcP9%252B%2FUL5YMBQ%3D%3D
U10: library part LMV324, "Quad General Purpose Op Amp", ComponentLink1Description=Datasheet, ComponentLink1URL=https://www.ti.com/lit/ds/symlink/lm224.pdf?

## Free pads (board coordinates)
  round 200 hole 126 unplated: M3_hole(1205,4825) M3_hole(1240,1185) M3_hole(6850,1140) M3_hole(6855,4845)

## Via types
v1: diameter 17.72, hole 7.87, Top Layer to GND, 55 vias
v2: diameter 17.72, hole 7.87, GND to Bottom Layer, 34 vias
v3: diameter 17.72, hole 7.87, Top Layer to 3V3, 18 vias

## Nets (pads, with @x,y where several pads share a name; then routed paths per layer and width w, separated by ;. In a path a pad name is that pad's centre, name@x,y a point inside that pad or via, vN(x,y) a via of type N, cw(c..) or ccw(c..) an arc to the next point about the centre after c; other vN are vias at no path point)
3V3: C1.1 C2.1 C5.1 C8.1 C9.1 C11.1 C39.1 C50.1 C51.1 FB2.1 H4.1 H5.1 H5.2 H5.3 H5.4 H5.5 H5.6 IC3.10 IC3.26 IC3.30 IC3.39 IC3.51 IC3.61 R1.1 R15.1 R17.2 R33.2 R40.1 R42.1 R45.2 R48.2 R49.2 R64.2 R102.1 U1.2 U3.2 U7.2 U8.1 U13.2 | length 4002.4
  Top Layer w4: v3(1150,4420) 1160.51,4430.51 1160.51,4450.51 C8.1@1180,4470 ; C9.1@1262.95,4270 1300,4270 v3(1370,4200) ; R15.1@1269.53,4045 1269.53,4046.97 1370,4147.44 v3(1370,4200) ; R49.2@1610.21,4257.51 1610.21,4255.54 1594.49,4239.83 1592.52,4239.83 1552.7,4200 v3(1370,4200) ; U3.2@1929.45,4803.82 1941.26,4803.82 2035,4710.08 v3(2035,4710) ; v3(2975,4975) 2977.62,4972.38 2987.62,4972.38 H4.1@3025,4935 ; v3(3450,3555) 3430,3575 R102.1@3394.53,3575 3394.53,3628.43 C51.1@3387.95,3635 3531.57,3635 C50.1@3536.57,3630 ; v3(3480,4205) 3483.71,4205 3488.71,4210 R64.2@3530.47,4210 ; U13.2@3839.68,4804.06 4030.94,4804.06 v3(4060,4775) ; v3(5245,4590) 5248.71,4590 5253.71,4585 C11.1@5302.05,4585 ; H5.6@5295,2349.76 H5.5@5395,2349.76 H5.4@5495,2349.76 H5.3@5595,2349.76 H5.2@5695,2349.76 H5.1@5795,2349.76 5826.96,2317.81 5847.19,2317.81 v3(5875,2290) ; C1.1@5325,4776.57 5469.76,4776.57 5538.19,4845 U7.2@5550,4845 v3(5600,4845) ; R1.1@5655,4090 5655,4053.71 5660,4048.71 v3(5660,4045) ; U1.2@5930,1135 v3(5930,1215) ; IC3.30@6244.49,1927.01 6257.28,1927.01 6263.09,1932.82 6263.71,1932.82 6267.22,1936.33 6267.22,1980.67 6259.83,1988.06 6246.43,1988.06 IC3.26@6244.49,1990 v3(6285,1990) ; R17.2@6270.47,3890 6281.14,3879.33 v3(6281.14,3860.47) ; IC3.39@6337.01,1834.49 6337.01,1821.69 6342.82,1815.88 6342.82,1815.27 6368.09,1790 v3(6390,1790) 6494.9,1790 6520.17,1815.27 6520.17,1815.88 6525.98,1821.69 IC3.51@6525.98,1834.49 6524.78,1835.69 6524.78,1988.42 6540.17,2003.81 6553.57,2003.81 IC3.61@6555.51,2005.75 6568.31,2005.75 6574.12,2011.56 6574.73,2011.56 6594.24,2031.07 6594.24,2074.66 6625.27,2105.69 6667.18,2105.69 6704.53,2143.03 R45.2@6704.53,2145 6704.53,2217.56 R42.1@6684.06,2238.03 ; IC3.10@6384.25,2145.51 6384.25,2206.82 6385.86,2208.43 6385.86,2216.88 6433.03,2264.06 R33.2@6435,2264.06 6500,2264.06 R40.1@6505,2259.06 ; R40.1@6506.97,2259.06 6552.91,2305 v3(6610,2305) 6612.62,2302.38 6623.65,2302.38 6684.06,2241.97 R42.1@6684.06,2240 ; v3(6645,1930) 6645,1926.29 6652.05,1919.24 C39.1@6652.05,1885 ; FB2.1@6711.5,1810 6736.22,1810 v3(6753.46,1827.24)
+5.0: C3.1 C7.1 C17.1 C32.1 C37.1 H3.1 H3.2 H3.3 H3.4 H3.5 H3.6 H11.1 H15.1 U2.3 U4.2 U6.10 U6.16 U8.14 U9.10 U9.16 | length 989.1
  Top Layer w4: C17.1@4875,2340 5029.76,2494.76 H3.6@5300,2494.76 H3.5@5400,2494.76 H3.4@5500,2494.76 H3.3@5600,2494.76 H3.2@5700,2494.76 H3.1@5800,2494.76
+12.0: C4.1 C6.1 F1.2 H1.1 H1.2 H1.3 H1.4 H1.5 H1.6 U1.3 U2.1 | length 1907.5
  Top Layer w4: H1.6@5295,2204.76 H1.5@5395,2204.76 H1.4@5495,2204.76 ; F1.2@5470,1974.88 5482.77,1987.65 5482.77,2192.53 H1.4@5495,2204.76 ; U1.3@6030.39,1135 6030.39,1299.61 5860,1470 5860,2139.76 H1.1@5795,2204.76 H1.2@5695,2204.76 H1.3@5595,2204.76 H1.4@5495,2204.76
AP_DTR: IC3.38 Q2.2 R2.1 | length 83.5
  Top Layer w4: R2.1@5930.47,3980 5945.63,3995.16 Q2.2@5945.63,4057.2
AP_EN: C10.1 D22.2 D23.2 R1.2 U7.3 | length 1478.9
  Top Layer w4: U7.3@5550,4795 5561.81,4795 5743.2,4613.61 5743.2,4163.77 5714.06,4134.62 R1.2@5714.06,4090 C10.1@5807.05,4090 5807.05,4085.87 5767.62,4046.44 5767.62,4037.62 v2(5765,4035) ; D23.2@5858.9,3615 5848.9,3625 D22.2@5848.9,3715 5848.9,3749.73 5910,3810.83 v1(5910,3865)
  Bottom Layer w4: v2(5765,4035) 5765,4010 v1(5910,3865)
  other v1: 5765,4035
  other v2: 5910,3865
AP_EN_AUTO: D23.1 Q1.3 | length 477.8
  Top Layer w4: v1(5660,3960) 5691.85,3960 5726.85,3995 Q1.3@5740.63,3995 ; v2(5665,3650) 5687.24,3627.76 5708.34,3627.76 D23.1@5721.1,3615
  Bottom Layer w4: v1(5660,3960) 5660,3658.71 5665,3653.71 v2(5665,3650)
  other v1: 5665,3650
  other v2: 5660,3960
AP_EN_KEY: C12.2 D22.1 H6.2 SW5.3 SW5.4 | length 858.5
  Top Layer w4: C12.2@5367.95,3850 5367.95,3852.63 5380.32,3865 H6.2@5510,3865 5552.32,3907.32 SW5.4@5691.42,3907.32 SW5.3@5868.58,3907.32 5868.58,3864.63 5894.27,3838.94 5894.27,3806.41 5802.86,3715 D22.1@5711.1,3715
AP_GPIO0: D24.2 D25.2 H26.10 R17.1 U7.25 | length 954.8
  Top Layer w4: U7.25@6238.98,4245 U7.25@6244.28,4245 ; v1(6260,4105) 6260,4083.9 D24.2@6268.9,4075 6266.66,4075 6253.9,4062.24 D25.2@6253.9,4000 6261.77,4000 6329.53,3932.24 R17.1@6329.53,3890 ; v2(6260,4215) 6260,4229.28 U7.25@6244.28,4245 ; H26.10@6665,3955 6375,4245 U7.25@6244.28,4245
  Bottom Layer w4: v1(6260,4105) v2(6260,4215)
  other v1: 6260,4215
  other v2: 6260,4105
AP_GPIO2: H26.11 U7.24 | length 686.7
  Top Layer w4: U7.24@6119.49,4195.79 6324.21,4195.79 H26.11@6665,3855
AP_GPIO4: H26.9 U7.26 | length 525.4
  Top Layer w4: U7.26@6238.98,4295 6425,4295 H26.9@6665,4055
AP_GPIO5: H26.6 U7.29 | length 463.3
  Top Layer w4: U7.29@6238.98,4445 6575,4445 H26.6@6665,4355
AP_GPIO12: H25.11 U7.14 | length 623.6
  Top Layer w4: H25.11@5090,3850 5485,4245 U7.14@5550,4245
AP_GPIO13: H25.12 U7.16 | length 821.1
  Top Layer w4: H25.12@5090,3750 5490,4150 5685.51,4150 5719.49,4183.98 U7.16@5719.49,4195.79
AP_GPIO14: H25.10 U7.13 | length 602.9
  Top Layer w4: H25.10@5090,3950 5154.5,3950 5499.5,4295 U7.13@5550,4295
AP_GPIO15: H26.12 U7.23 | length 804.6
  Top Layer w4: U7.23@6069.49,4195.79 6069.49,4150.51 6085,4135 6285,4135 H26.12@6665,3755
AP_GPIO16: H26.8 U7.27 | length 504.7
  Top Layer w4: U7.27@6238.98,4345 6475,4345 H26.8@6665,4155
AP_GPIO17: H26.7 U7.28 | length 484
  Top Layer w4: U7.28@6238.98,4395 6525,4395 H26.7@6665,4255
AP_GPIO18: H26.5 U7.30 | length 442.6
  Top Layer w4: U7.30@6238.98,4495 6625,4495 H26.5@6665,4455
AP_GPIO19: H26.4 U7.31 | length 430.2
  Top Layer w4: U7.31@6238.98,4545 6248.98,4555 H26.4@6665,4555
AP_GPIO21: H26.3 U7.33 | length 430.2
  Top Layer w4: U7.33@6238.98,4645 6248.98,4655 H26.3@6665,4655
AP_GPIO22: H26.2 U7.36 | length 442.6
  Top Layer w4: U7.36@6238.98,4795 6625,4795 H26.2@6665,4755
AP_GPIO23: H26.1 U7.37 | length 430.2
  Top Layer w4: U7.37@6238.98,4845 6655,4845 H26.1@6665,4855
AP_GPIO25: H25.7 U7.10 | length 540.8
  Top Layer w4: H25.7@5090,4250 5343.19,4250 5538.19,4445 U7.10@5550,4445
AP_GPIO26: H25.8 U7.11 | length 561.5
  Top Layer w4: H25.8@5090,4150 5293.19,4150 5538.19,4395 U7.11@5550,4395
AP_GPIO27: H25.9 U7.12 | length 582.2
  Top Layer w4: H25.9@5090,4050 5243.19,4050 5538.19,4345 U7.12@5550,4345
AP_GPIO32: H25.5 U7.8 | length 499.4
  Top Layer w4: H25.5@5090,4450 5404.5,4450 5499.5,4545 U7.8@5550,4545
AP_GPIO33: H25.6 U7.9 | length 520.1
  Top Layer w4: H25.6@5090,4350 5315.82,4350 5460.82,4495 U7.9@5550,4495
AP_GPIO34: H25.3 U7.6 | length 462.1
  Top Layer w4: H25.3@5090,4650 5545,4650 U7.6@5550,4645
AP_GPIO35: H25.4 U7.7 | length 478.6
  Top Layer w4: H25.4@5090,4550 5493.19,4550 5538.19,4595 U7.7@5550,4595
AP_GPIO36: H25.1 U7.4 | length 503.5
  Top Layer w4: H25.1@5090,4850 5199.78,4850 5300.86,4748.92 5546.08,4748.92 U7.4@5550,4745
AP_GPIO39: H25.2 U7.5 | length 482.8
  Top Layer w4: H25.2@5090,4750 5145,4695 U7.5@5550,4695
AP_IO0_AUTO: D25.1 Q2.3 | length 145.7
  Top Layer w4: Q2.3@6024.37,4095 6038.15,4095 6048.94,4084.2 6048.94,4059.28 6108.23,4000 D25.1@6116.1,4000
AP_IO0_KEY: D24.1 H24.2 SW6.3 SW6.4 | length 384.5
  Top Layer w4: SW6.4@6026.42,3902.32 SW6.3@6203.58,3902.32 6203.58,3962.25 6151.74,4014.09 6151.74,4062.24 6138.98,4075 D24.1@6131.1,4075
AP_RTS: IC3.36 Q1.2 R3.1 | length 215.3
  Top Layer w4: Q1.2@5819.37,4032.8 5833.15,4032.8 5868.32,3997.62 5877.38,3997.62 v1(5880,3995) ; v1(5900,3930) 5925.94,3904.06 R3.1@5955,3904.06
  Bottom Layer w4: v1(5880,3995) 5900,3975 v1(5900,3930)
  other v2: 5900,3930 5880,3995
AP_RXD: IC3.35 R108.1 | length 310.6
  Top Layer w4: R108.1@6006.65,1730 6009.61,1730 6071.61,1792 6170.99,1792 6213.48,1834.49 IC3.35@6274.02,1834.49
AP_TXD: IC3.34 R107.1 | length 264.7
  Top Layer w4: R107.1@6006.34,1800 6167.68,1800 6231.69,1864.02 IC3.34@6244.49,1864.02
AP_U0RXD: R107.2 U7.34
AP_U0TXD: R108.2 U7.35
CLIENT_DTR: IC3.21 Q6.2 R47.1
CLIENT_EN: C16.1 D14.2 D15.2 R15.2 U3.3 | length 3525.9
  Top Layer w4: R15.2@1210.47,4045 1210.47,4046.97 1262.95,4099.45 C16.1@1262.95,4165 1262.95,4169.13 1307.38,4213.56 1307.38,4222.38 v1(1310,4225) ; U3.3@1929.45,4753.82 1917.64,4753.82 1893.92,4777.54 1893.92,4874.02 1897.44,4877.54 2187.46,4877.54 v2(2245,4820) 2314.96,4889.96 2767.62,4889.96 2768.43,4889.14 2781.57,4889.14 2782.38,4889.96 3201.44,4889.96 3205,4886.4 3205,4802.34 ; D15.2@2993.9,4675 3133.49,4675 3162.72,4704.22 3175.73,4704.22 3205,4733.49 3205,4802.34 ; D14.2@2993.9,4810 3003.9,4800 3202.66,4800 3205,4802.34
  Bottom Layer w4: v1(1310,4225) 1495.04,4410.04 1845.04,4410.04 2249.34,4814.34 2245,4818.69 v2(2245,4820)
  other v1: 2245,4820
  other v2: 1310,4225
CLIENT_EN_AUTO: D15.1 Q4.3
CLIENT_EN_KEY: C35.2 D14.1 H19.2 SW1.3 SW1.4 | length 653.9
  Top Layer w4: SW1.3@2336.42,3762.68 SW1.4@2513.58,3762.68 2519.49,3762.68 2539.27,3782.46 ; C35.2@2430,3950 2430,3945.87 2442.37,3933.5 2469.36,3933.5 2539.27,3863.59 2539.27,3782.46 ; H19.2@2740,3815 2571.81,3815 2539.27,3782.46
CLIENT_GPIO0: D16.2 D17.2 H9.10 R49.1 U3.25 | length 683.4
  Top Layer w4: U3.25@2618.43,4203.82 2630.24,4203.82 2645.95,4188.1 2645.95,4134.05 2825,3955 3160,3955 H9.10@3165,3950
CLIENT_GPIO2: H9.11 U3.24 | length 826.4
  Top Layer w4: U3.24@2498.94,4154.61 2514.65,4130.35 2706.09,3938.91 2706.09,3937.25 2706.09,3936.14 ccw(c2740,3915) 2755.93,3878.36 2762.22,3881.09 ; 2762.25,3881.09 2763.91,3881.09 2790.04,3854.96 3160.04,3854.96 H9.11@3165,3850
CLIENT_GPIO4: H9.9 U3.26 | length 631
  Top Layer w4: U3.26@2618.43,4253.82 2630.24,4253.82 2834.06,4050 H9.9@3165,4050
CLIENT_GPIO5: H9.6 U3.29 | length 568.9
  Top Layer w4: U3.29@2618.43,4403.82 2634.14,4388.1 3055.58,4388.1 3093.68,4350 H9.6@3165,4350
CLIENT_GPIO12: H7.11 U3.14 | length 565.7
  Top Layer w4: H7.11@1520,3850 1613.37,3943.37 1650.1,3943.37 1772.01,4065.28 1772.01,4081.91 1893.92,4203.82 U3.14@1929.45,4203.82
CLIENT_GPIO13: H7.12 U3.16 | length 753.4
  Top Layer w4: H7.12@1520,3750 1688.49,3750 1883.15,3944.65 1900.8,3944.65 2098.94,4142.8 U3.16@2098.94,4154.61
CLIENT_GPIO14: H7.10 U3.13 | length 553.8
  Top Layer w4: H7.10@1520,3950 1594.31,4024.31 1719.73,4024.31 1723.24,4027.83 1723.24,4049.56 1810.83,4137.14 1810.83,4147.01 1917.64,4253.82 U3.13@1929.45,4253.82
CLIENT_GPIO15: H9.12 U3.23 | length 904.5
  Top Layer w4: U3.23@2448.94,4154.61 2448.94,4119.08 2700.97,3867.04 2744.46,3867.04 2861.51,3750 H9.12@3165,3750
CLIENT_GPIO16: H9.8 U3.27 | length 610.3
  Top Layer w4: U3.27@2618.43,4303.82 2819.92,4303.82 2973.74,4150 H9.8@3165,4150
CLIENT_GPIO17: H9.7 U3.28 | length 589.6
  Top Layer w4: U3.28@2618.43,4353.82 2844.92,4353.82 2948.74,4250 H9.7@3165,4250
CLIENT_GPIO18: H9.5 U3.30 | length 548.2
  Top Layer w4: U3.30@2618.43,4453.82 2622.24,4450 H9.5@3165,4450
CLIENT_GPIO19: H9.4 U3.31 | length 565.7
  Top Layer w4: U3.31@2618.43,4503.82 2864.03,4503.82 2875.98,4515.76 3130.76,4515.76 H9.4@3165,4550
CLIENT_GPIO21: H4.3 H9.3 U3.33 | length 1046
  Top Layer w4: U3.33@2628.27,4603.82 3118.82,4603.82 H9.3@3165,4650 ; U3.33@2630.24,4603.82 2656.42,4630 v1(2770,4630) ; v1(2775,4905) 2795,4905 H4.3@2825,4935
  Bottom Layer w4: v1(2770,4630) 2770,4633.71 2775,4638.71 v1(2775,4905)
  other v2: 2770,4630 2775,4905
CLIENT_GPIO22: H4.2 H9.2 U3.36 | length 944.5
  Top Layer w4: U3.36@2618.43,4753.82 2623.01,4749.24 3064.02,4749.24 3064.78,4750 H9.2@3165,4750 3157,4758 2977,4758 v2(2965,4770) ; H4.2@2925,4935 2931.29,4935 2956.29,4910 v1(2960,4910)
  Bottom Layer w4: v1(2960,4910) 2960,4843.81 2965,4838.81 v2(2965,4770)
  other v1: 2965,4770
  other v2: 2960,4910
CLIENT_GPIO23: H9.1 U3.37 | length 565.7
  Top Layer w4: U3.37@2618.43,4803.82 2630.24,4803.82 2676.42,4850 H9.1@3165,4850